# Altium PCB MB1379.PcbDoc
Units mm, origin at the board's own origin, x right, y up, seen from the top; angles counter-clockwise.
Board outline 29.13 x 44.63 mm, 2 copper layers (Top Layer, Bottom Layer), stack 1.571 mm thick; 39 components, 34 nets, 147 pads, 91 vias.
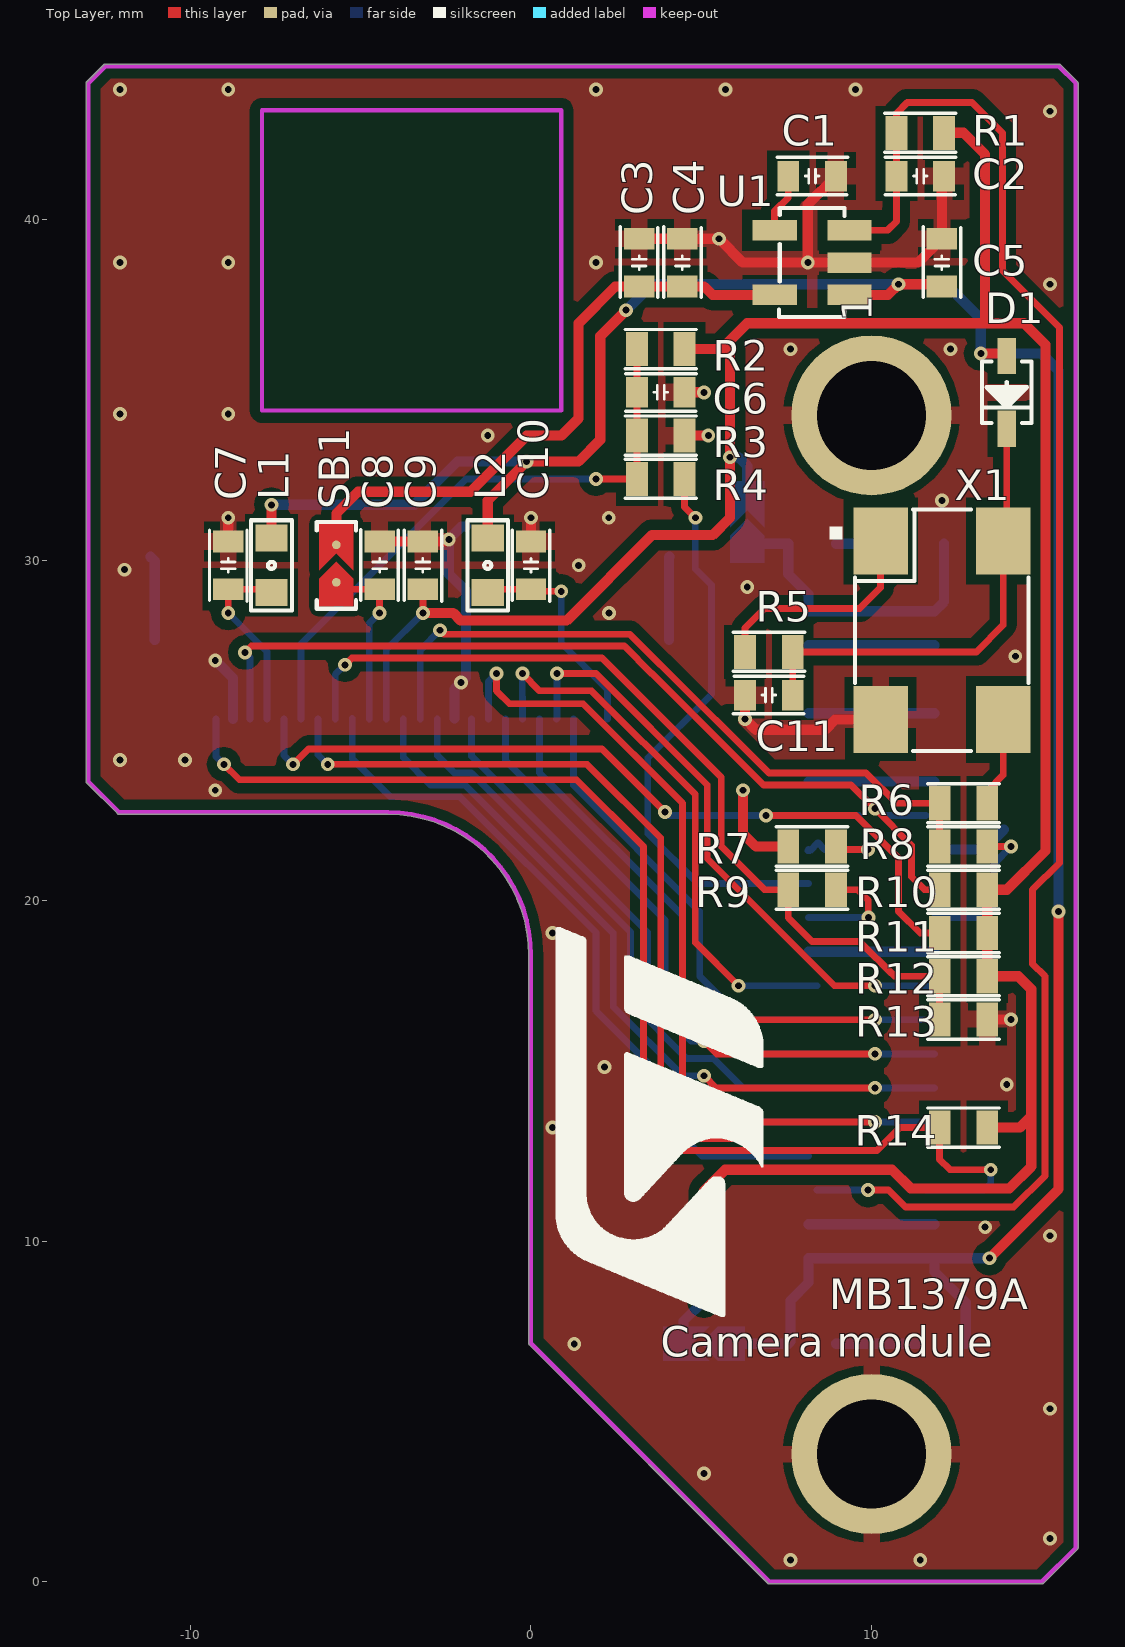
[diagram p0: Top Layer view]
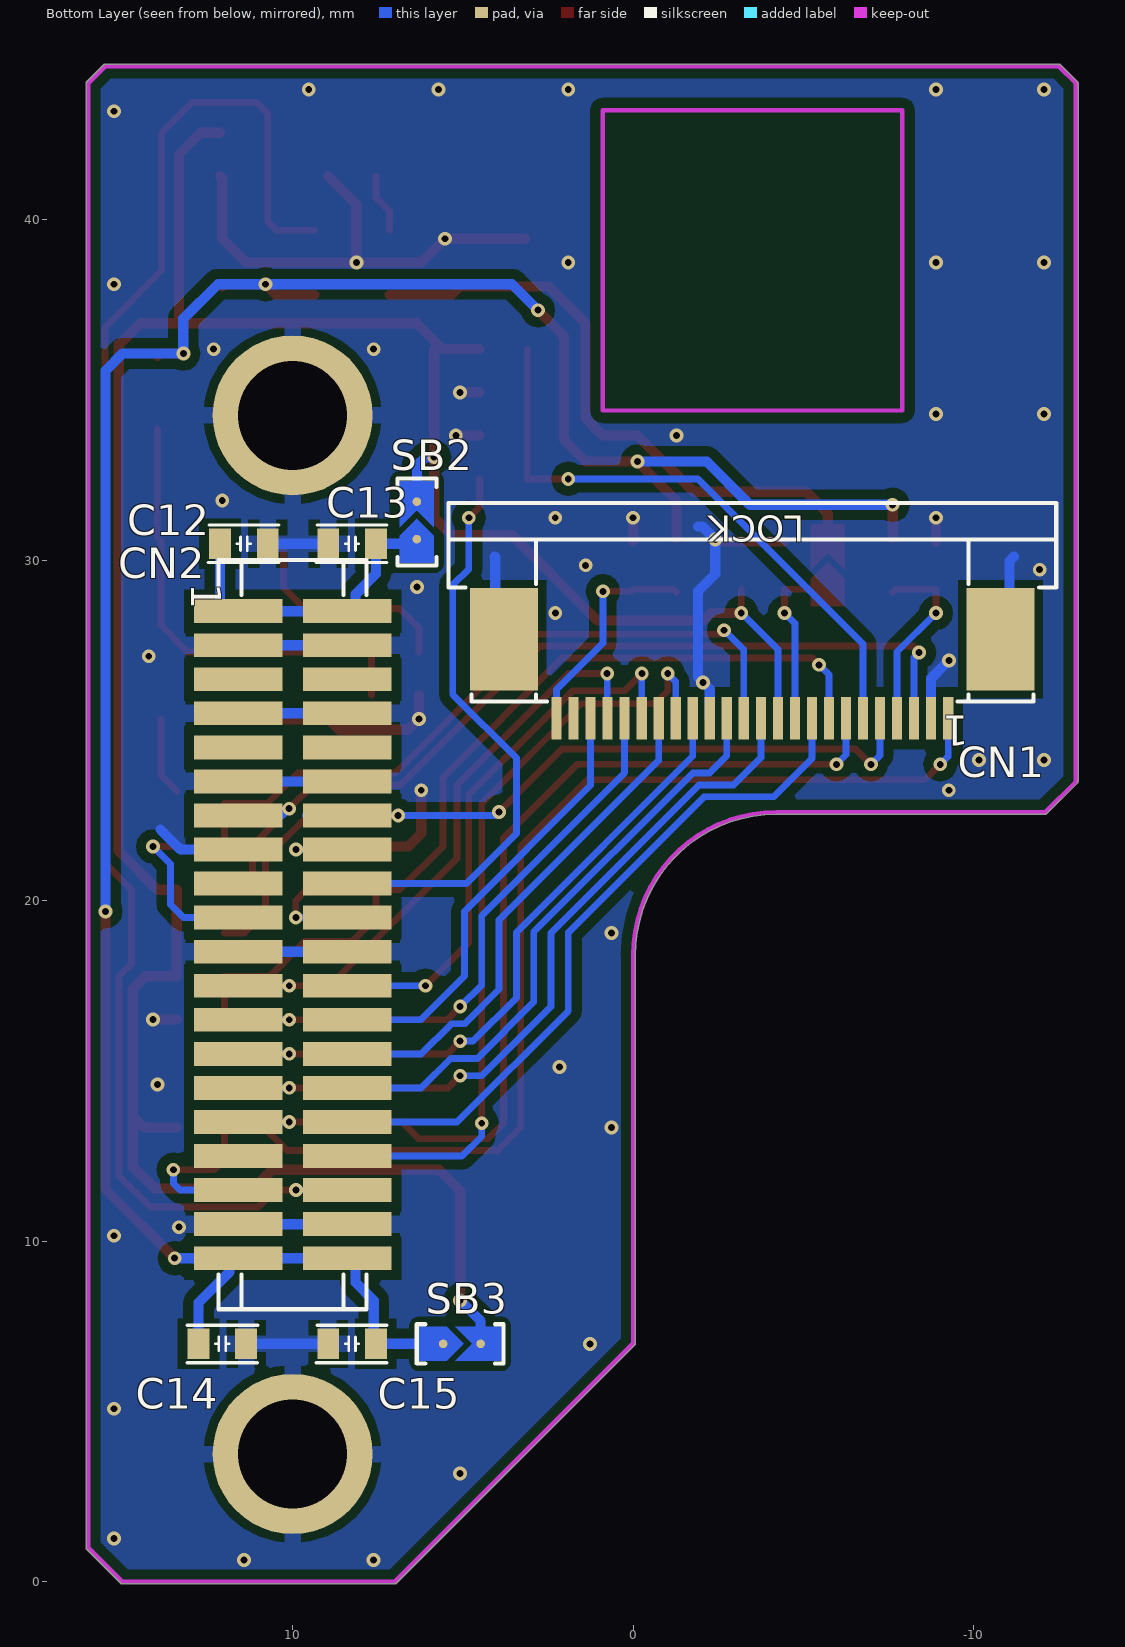
[diagram p1: Bottom Layer view, seen from below]
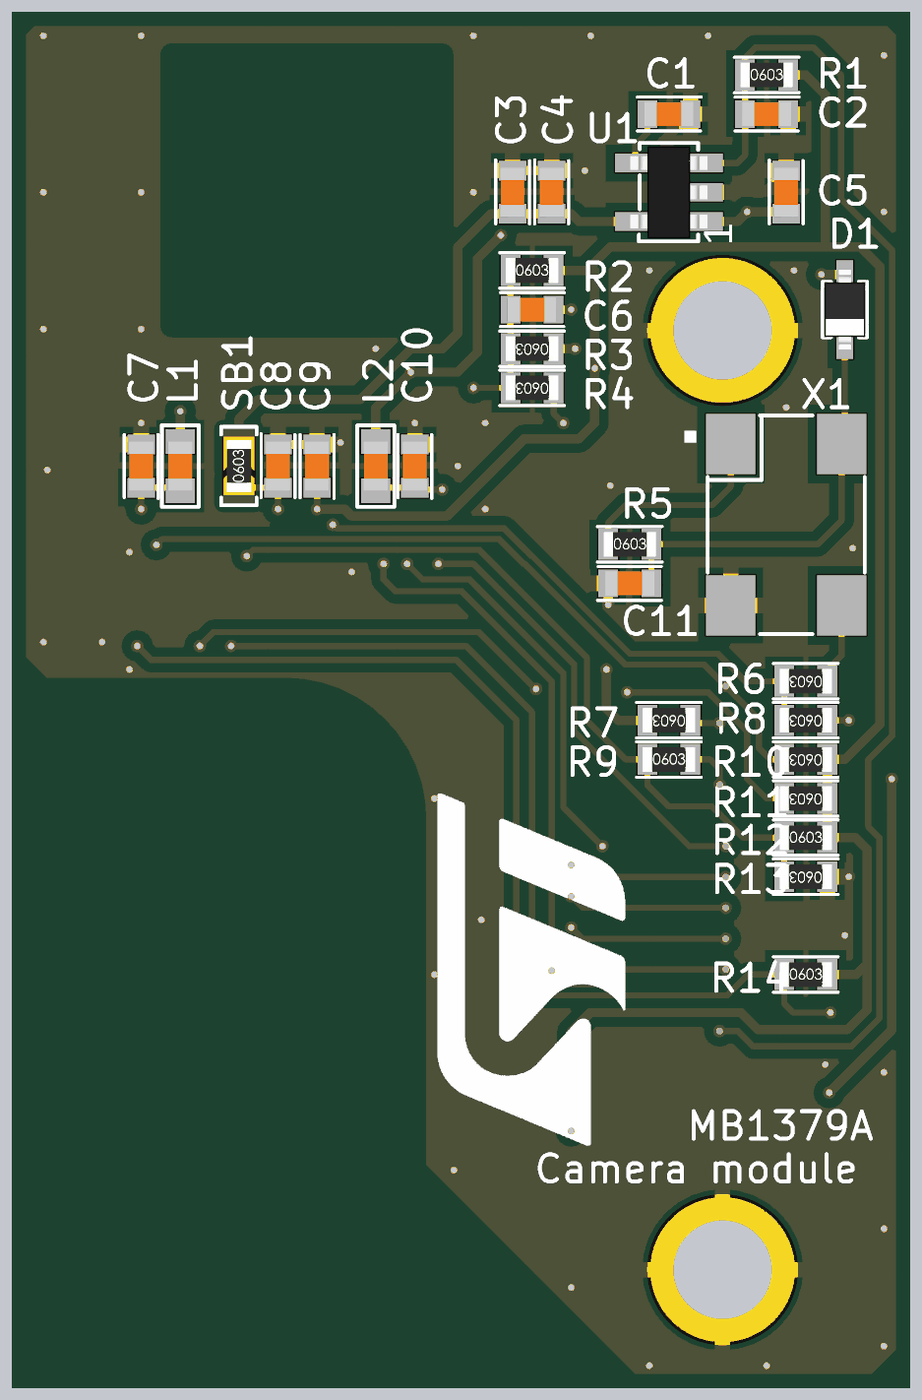
[diagram p2: 3D render of the assembled board from above, using the file's embedded part models]
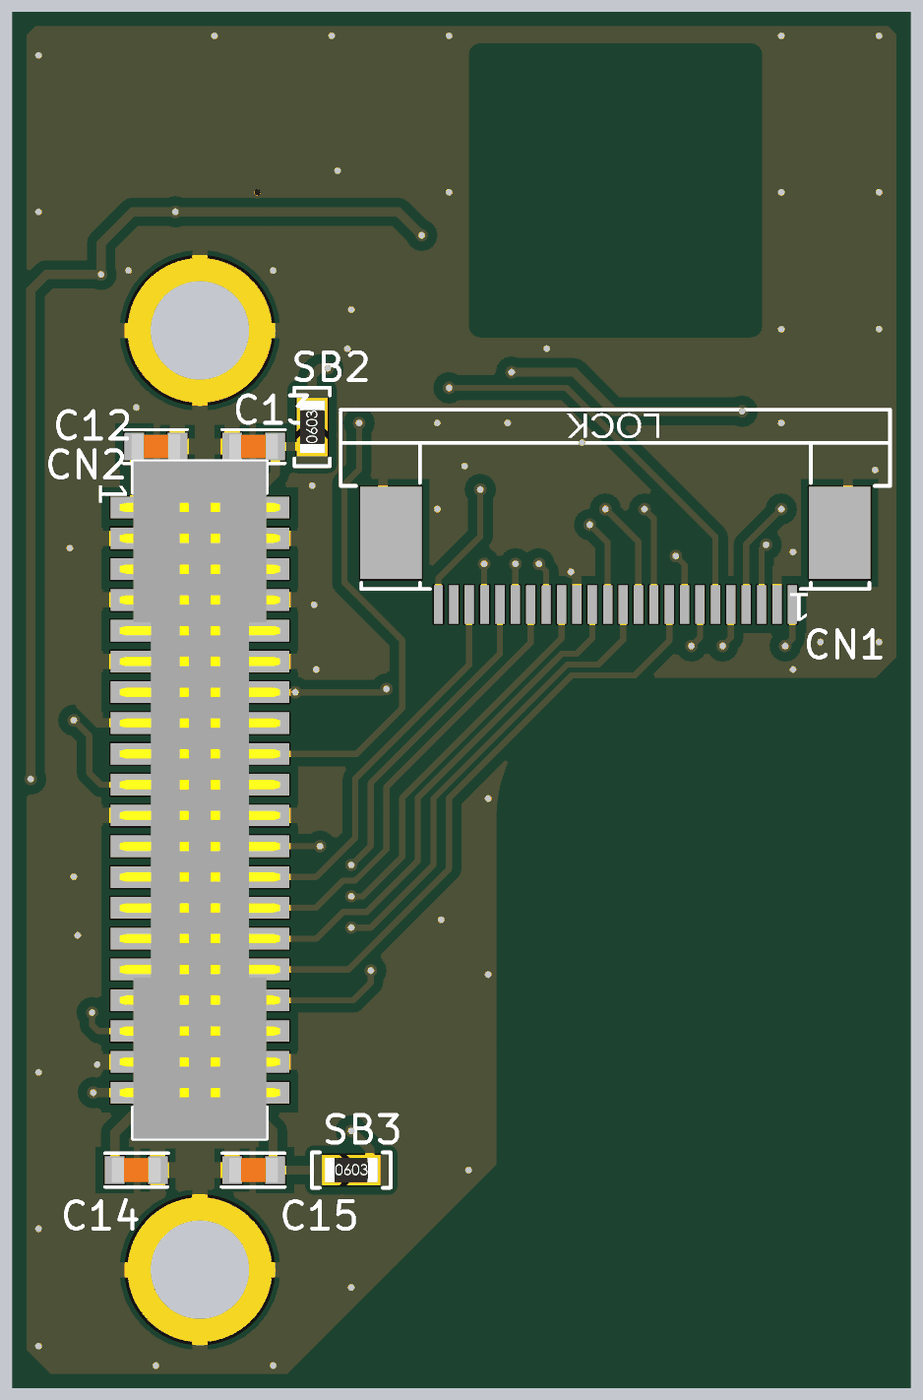
[diagram p3: 3D render of the assembled board from below, using the file's embedded part models]

## Layer stack, top to bottom
Top Solder: solder mask 0.0102, Solder Resist, Dk 3.5
Top Layer: signal copper 0.0356
Dielectric1: core 1.5, FR-4, Dk 4.8
Bottom Layer: signal copper 0.0356
Bottom Solder: solder mask 0.0102, Solder Resist, Dk 3.5

## Board outline
-12.1,22.536 -4.2,22.536 ccw(c-4.2,22.6) -4.199,22.536 cw(c-4.2,18.4) -0.064,18.4 ccw(c0,18.4) -0.064,18.399 -0.064,7 cw(c0,7) -0.064,7 ccw(c0,7) -0.045,6.955 cw(c0,7) -0.064,7 -0.045,6.955 6.955,-0.045 ccw(c7,0) 7,-0.064 15,-0.064 ccw(c15,0) 15.045,-0.045 16.045,0.955 ccw(c16,1) 16.064,1 16.064,44 ccw(c16,44) 16.045,44.045 15.545,44.545 ccw(c15.5,44.5) 15.5,44.564 -12.5,44.564 ccw(c-12.5,44.5) -12.545,44.545 -13.045,44.045 ccw(c-13,44) -13.064,44 -13.064,23.5 ccw(c-13,23.5) -13.045,23.455 -12.145,22.555 ccw(c-12.1,22.6)

## Design rules (kind name [scope] priority, off if disabled: settings)
Clearance Clearance_1 [(InPoly)] p1: gap=0.3
Clearance [All] p2: gap=0.15
FabricationTestPointUsage TestPointUsage [All] p1: valid=0 allowmultiple=FALSE
FabricationTestpoint Testpoint [(IsPad And (OnTopLayer Or OnBottomLayer))] p1: side=3 testpointundercomponent=TRUE minsize=1.016 maxsize=2.54 preferedsize=1.524 minholesize=0 maxholesize=1.016 preferedholesize=0.813 testpointgrid=0.025 allowsidetop=TRUE allowsidebottom=TRUE usegrid=TRUE gridtolerance=0
HoleSize [All] p1: absolutevalues=TRUE maxlimit=3.81 minlimit=0.025 maxpercent=80.000 minpercent=20.000
PlaneClearance [All] p1: clearance=0.5
PolygonConnect PolygonConnect_2 [(InComponent('CN1'))] p1: connectstyle=NoConnect reliefconductorwidth=0.254 reliefentries=2 polygonreliefangle="90 Angle" airgapwidth=0.254
PolygonConnect PolygonConnect_1 [IsVia] p2: connectstyle=Direct reliefconductorwidth=0.508 reliefentries=4 polygonreliefangle="90 Angle" airgapwidth=0.254
PolygonConnect [All] p3: connectstyle=Relief reliefconductorwidth=0.5 reliefentries=4 polygonreliefangle="90 Angle" airgapwidth=0.254
RoutingLayers [All] p1: top layer_v5=FALSE bottom layer_v5=FALSE
RoutingVias [All] p1: holewidth=0.3 width=0.6 viastyle="Through Hole" minholewidth=0.2 minwidth=0.4 maxholewidth=0.7 maxwidth=1.3
SolderMaskExpansion [All] p1: expansion=0.102
Width [All] p1: maxlimit=2.5 minlimit=0.15 preferedwidth=0.2 minimp=50.000000 maximp=50.000000 favimp=50.000000
25 further rules are at their usual default settings.

## Classes and differential pairs
net class PAR_D[0..7]: PAR_D0 PAR_D1 PAR_D2 PAR_D3 PAR_D4 PAR_D5 PAR_D6 PAR_D7

## Components (designator, comment, footprint, x,y, rotation, side; value= is the part's Value field where it differs from the comment)
C1 "" C0603 8.255,41.275 r180 top (schematic designator C66)
C2 "" C0603 11.43,41.275 r180 top (schematic designator C62)
C3 "" C0603 3.175,38.735 r270 top (schematic designator C68)
C4 "" C0603 4.445,38.735 r270 top (schematic designator C67)
C5 "" C0603 12.065,38.735 r270 top (schematic designator C61)
C6 "" C0603 3.81,34.925 r180 top (schematic designator C9)
C7 "" C0603 -8.89,29.845 r90 top (schematic designator C5)
C8 "" C0603 -4.445,29.845 r270 top (schematic designator C10)
C9 "" C0603 -3.175,29.845 r90 top (schematic designator C4)
C10 "" C0603 0,29.845 r90 top (schematic designator C3)
C11 "" C0603 6.985,26.035 r0 top (schematic designator C8)
C12 "" C0603 11.43,30.48 r180 bottom (schematic designator C2)
C13 "" C0603 8.255,30.48 r180 bottom (schematic designator C1)
C14 "" C0603 12.065,6.985 r0 bottom (schematic designator C7)
C15 "" C0603 8.255,6.985 r180 bottom (schematic designator C6)
CN1 "" CON_ATOM_FPC05024-03200 -3.5,30.6 r0 bottom (schematic designator CN2)
CN2 "" CON_SAMTEC_FTMH-120-03-L-DV-ES 10,19 r270 bottom (schematic designator CN1)
D1 "" DIO_SOD323 13.97,34.925 r270 top
L1 "" L0603 -7.62,29.845 r90 top
L2 "" L0603 -1.27,29.845 r90 top
R1 "" R0603 11.43,42.545 r0 top (schematic designator R10)
R2 "" R0603 3.81,36.195 r0 top
R3 "" R0603 3.81,33.655 r180 top (schematic designator R14)
R4 "" R0603 3.81,32.385 r180 top (schematic designator R13)
R5 "" R0603 6.985,27.305 r0 top (schematic designator R7)
R6 "" R0603 12.7,22.86 r180 top
R7 "" R0603 8.255,21.59 r180 top (schematic designator R3)
R8 "" R0603 12.7,21.59 r180 top (schematic designator R5)
R9 "" R0603 8.255,20.32 r0 top (schematic designator R12)
R10 "" R0603 12.7,20.32 r180 top (schematic designator R8)
R11 "" R0603 12.7,19.05 r180 top (schematic designator R9)
R12 "" R0603 12.7,17.78 r0 top (schematic designator R1)
R13 "" R0603 12.7,16.51 r180 top (schematic designator R4)
R14 "" R0603 12.7,13.335 r0 top (schematic designator R11)
SB1 "" SOLDER-BRIDGE_R0603-0R -5.715,29.845 r90 top
SB2 "" SOLDER-BRIDGE_R0603-0R 6.35,31.115 r90 bottom (schematic designator SB3)
SB3 "" SOLDER-BRIDGE_R0603-0R 5.08,6.985 r180 bottom (schematic designator SB2)
U1 "" REG_SOT23-5L 8.255,38.735 r90 top (schematic designator U2)
X1 "" OSC_PLE_SM77H-SERIES_7X5_H1P73_4P 12.065,27.94 r270 top

## Footprints (in the part's own frame and the unit in brackets; to place one, negate y for a bottom-side part, rotate by r counter-clockwise, add the part's x,y. Pads: shape width x height; smd on the part's side, far side on the other; paste and mask are expansions set on the pad)
C0603 [mm]
  rect 0.64x0.89 smd mask+0.05: 1(-0.7,0) 2(0.7,0)
  silkscreen extent -1.05,-0.55 1.02,0.55, body extent -0.9,-0.5 0.9,0.5, height 1.4
CON_ATOM_FPC05024-03200 [mm] "MCD-01009"
  rect 0.3x1.25 smd mask+0.05: 1(-5.75,5.25) 2(-5.25,5.25) 3(-4.75,5.25) 4(-4.25,5.25) 5(-3.75,5.25) 6(-3.25,5.25) 7(-2.75,5.25) 8(-2.25,5.25) 9(-1.75,5.25) 10(-1.25,5.25) 11(-0.75,5.25) 12(-0.25,5.25) 13(0.25,5.25) 14(0.75,5.25) 15(1.25,5.25) 16(1.75,5.25) 17(2.25,5.25) 18(2.75,5.25) 19(3.25,5.25) 20(3.75,5.25) 21(4.25,5.25) 22(4.75,5.25) 23(5.25,5.25) 24(5.75,5.25)
  rect 2x3 smd mask+0.05: 25(-7.29,2.925) 26(7.29,2.925)
  silkscreen extent -8.93,-1.07 8.93,4.75, body extent -8.93,-1.07 8.93,5.75, height 2.2
CON_SAMTEC_FTMH-120-03-L-DV-ES [mm] "MCD-01010"
  rect 0.7x2.6 smd mask+0.05: 1(-9.5,-1.6) 2(-9.5,1.6) 3(-8.5,-1.6) 4(-8.5,1.6) 5(-7.5,-1.6) 6(-7.5,1.6) 7(-6.5,-1.6) 8(-6.5,1.6) 9(-5.5,-1.6) 10(-5.5,1.6) 11(-4.5,-1.6) 12(-4.5,1.6) 13(-3.5,-1.6) 14(-3.5,1.6) 15(-2.5,-1.6) 16(-2.5,1.6) 17(-1.5,-1.6) 18(-1.5,1.6) 19(-0.5,-1.6) 20(-0.5,1.6) 21(0.5,-1.6) 22(0.5,1.6) 23(1.5,-1.6) 24(1.5,1.6) 25(2.5,-1.6) 26(2.5,1.6) 27(3.5,-1.6) 28(3.5,1.6) 29(4.5,-1.6) 30(4.5,1.6) 31(5.5,-1.6) 32(5.5,1.6) 33(6.5,-1.6) 34(6.5,1.6) 35(7.5,-1.6) 36(7.5,1.6) 37(8.5,-1.6) 38(8.5,1.6) 39(9.5,-1.6) 40(9.5,1.6)
  silkscreen extent -11,-2.17 11,2.17, body extent -11,-2.6 11,2.6, height 3.84
DIO_SOD323 [mm]
  rect 1.06x0.54 smd mask+0.05: 1(-1.07,0) 2(1.07,0)
  silkscreen extent -0.9,-0.72 0.9,0.72, body extent -1.3,-0.78 1.3,0.78, height 1.17
L0603 [mm]
  rect 0.8x0.95 smd mask+0.05: 1(-0.8,0) 2(0.8,0)
  silkscreen extent -1.33,-0.6 1.33,0.6, body extent -0.87,-0.47 0.87,0.47, height 0.95
OSC_PLE_SM77H-SERIES_7X5_H1P73_4P [mm]
  rect 1.96x1.6 smd mask+0.05: 1(-2.62,-1.8) 2(2.62,-1.8) 3(2.62,1.8) 4(-2.62,1.8)
  silkscreen extent -3.55,-3.3 3.55,2.55, body extent -3.55,-2.55 3.55,2.55, height 2.17
R0603 [mm]
  rect 0.64x1 smd mask+0.05: 1(-0.7,0) 2(0.7,0)
  silkscreen extent -1.05,-0.58 1.05,0.58, body extent -0.9,-0.5 0.9,0.5, height 0.56
REG_SOT23-5L [mm]
  rect 0.6x1.3 smd mask+0.05: 1(-0.95,-1.1) 2(0,-1.1) 3(0.95,-1.1) 4(0.95,1.1) 5(-0.95,1.1)
  silkscreen extent -1.6,-0.95 1.6,0.97, body extent -1.52,-1.25 1.52,1.25, height 1.1
SOLDER-BRIDGE_R0603-0R [mil]
  round 10 smd: 1(-19.68,0) 2(23.62,0)
  Top Layer region: -47.24,-19.69 -47.24,19.68 -15.75,19.68 3.94,0 -15.75,-19.69 -47.24,-19.69
  Top Layer region: -5.91,19.68 13.78,0 -5.91,-19.69 47.24,-19.69 47.24,19.68 -5.91,19.68
  silkscreen extent -50,-23 50,23, body extent -36,-20 36,20, height 22

## Part data
C1: library part MCD-01007, "Capacitor, MLCC, 10nF, 16V, X7R, 10%, 0603, T=0.8mm"
C2 C4 C7 C8 C9 C10 C11 C12 C13 C14 C15: library part MCD-00211, "Capacitor,100nF,16V,X7R,10%,0603"
C3 C5: library part MCD-00010, "Capacitor,1uF,16V,X5R,10%,0603"
C6: library part MCD-01006, "Capacitor, MLCC, 470nF, 16V, X7R, 10%, 0603, T=0.8mm"
CN1: library part MCD-01009, "FFC/FPC ZIF Connector -?0.5mm, 24 pins, Upper Contacts"
CN2: library part MCD-01010, "Header 20x2, 1mm, Dual Vertical,SMT,End Shroud,Height 3.25mm"
D1: library part MCD-00034, "BAT60JFILM"
L1 L2: library part MCD-00047, "SMD Chip ferrite bead, 600R@100MHz +/-25%, 350mA, 500mohm DC, 0603, T=0.8mm"
R1 R2 R3 R5 R13 R14: library part MCD-00220, "Resistor,10K,0603,1%,1/10W"
R4: library part MCD-00420, "Resistor,2K,0603,1%,1/10W"
R6 R7 R8 R9: library part MCD-00056, "Resistor,0R,0603,5%,1/10W"
R10 R11: library part MCD-00219, "Resistor,4K7,0603,1%,1/10W"
R12: library part MCD-00430, "Resistor,22K,0603,1%,1/10W"
SB1 SB3: library part MCD-00071, "Solder Bridge ON"
SB2: library part MCD-00072, "Solder Bridge OFF"
U1: library part MCD-01008, "LDO - 300 mA low quiescent current - very low noise"
X1: library part MCD-01011, "SM77H Series 2.5V? CMOS 24MHz Clock Oscillator"

## Free pads (board coordinates)
  round 4.7 hole 3.2: 0(10,3.75) 0(10,34.25)

## Via types
v1: diameter 0.406, hole 0.203, Top Layer to Bottom Layer, tented both sides, 75 vias
v2: diameter 0.4, hole 0.2, Top Layer to Bottom Layer, tented both sides, 16 vias

## Nets (pads, with @x,y where several pads share a name; then routed paths per layer and width w, separated by ;. In a path a pad name is that pad's centre, name@x,y a point inside that pad or via, vN(x,y) a via of type N, cw(c..) or ccw(c..) an arc to the next point about the centre after c; other vN are vias at no path point)
+1V8: C12.1 C13.2 CN2.1 CN2.2 SB2.1 | length 9.3
  Bottom Layer w0.3: SB2.1 6.485,30.48 C13.2 7.555,29.591 8.15,28.996 8.15,28.5 11.85,28.5 12.13,28.78 C12.1
+2V8: C5.2 C14.2 C15.2 CN2.39 CN2.40 D1.1 L1.2 L2.2 SB3.1 U1.1 | length 75.7
  Top Layer w0.3: L1.2 v1(-7.62,31.623) ; L2.2 -1.27,31.75 v1(-0.127,32.893) 1.397,32.893 2.032,33.528 2.032,36.576 v1(2.794,37.338) ; U1.1 10.48,37.785 v1(10.795,38.1) 12,38.1 C5.2 ; v1(13.208,36.068) 13.897,36.068 D1.1 ; v1(13.462,9.5) 15.494,11.532 v1(15.494,19.685)
  Bottom Layer w0.3: v1(-7.62,31.623) -3.429,31.623 -2.159,32.893 v1(-0.127,32.893) ; v1(2.794,37.338) 3.556,38.1 v1(10.795,38.1) 12.192,38.1 13.208,37.084 v1(13.208,36.068) 14.986,36.068 15.494,35.56 v1(15.494,19.685) ; 6.28,6.985 C15.2 7.62,7.05 7.62,8.255 8.15,8.785 8.15,9.5 CN2.39@11.85,9.5 ; C14.2 12.765,8.19 11.85,9.105 CN2.39@11.85,9.5 ; v1(13.462,9.5) CN2.39@11.85,9.5
CAMERA_CLK: CN1.13 R6.2 R8.2 | length 20.9
  Top Layer w0.2: v1(-2.667,27.94) -2.55,27.823 2.898,27.823 3.797,26.924 3.81,26.924 6.985,23.749 9.841,23.749 10.73,22.86 R6.2 R8.2
  Bottom Layer w0.2: CN1.13@-3.25,25.338 -3.25,27.357 v1(-2.667,27.94)
CAMERA_RST: CN2.18 R4.1 | length 16.8
  Top Layer w0.2: R4.1 4.51,31.558 v1(4.826,31.242)
  Bottom Layer w0.2: v1(4.826,31.242) 4.826,29.74 5.3,29.266 5.3,26.059 3.429,24.188 3.429,21.971 4.9,20.5 CN2.18@8.15,20.5
CAMERA_RST_S5K: C6.2 CN1.6 R2.1 R3.2 R4.2 | length 17.9
  Top Layer w0.2: v1(1.905,32.385) R4.2 R3.2 C6.2 R2.1
  Bottom Layer w0.2: CN1.6@-6.75,25.338 -6.75,27.54 -1.905,32.385 v1(1.905,32.385)
DOVDD: C9.1 CN1.11 R1.2 R2.2 R10.1 R11.1 R12.2 R14.2 SB2.2 SB3.2 | length 81.7
  Top Layer w0.2: v1(-3.175,28.448) C9.1
  Top Layer w0.3: v1(-3.175,28.448) -2.286,28.448 -2.061,28.223 1.045,28.223 3.561,30.739 3.566,30.734 5.334,30.734 5.842,31.242 v1(5.842,33.02) 5.842,36.195 R2.2 ; v1(5.08,8.255) 5.08,11.48 5.7,12.1 10.6,12.1 11.15,11.55 14.05,11.55 14.691,12.191 14.691,17.399 14.31,17.78 R12.2 R11.1 R10.1 13.97,20.32 15.108,21.458 15.108,36.327 14.478,36.957 13.335,36.957 ; 5.588,36.195 6.35,36.957 13.335,36.957 ; R1.2 12.7,42.545 13.335,41.91 13.335,36.957 ; R14.2 14.351,13.335 14.6,13.584
  Bottom Layer w0.2: CN1.11@-4.25,25.338 -4.25,27.373 v1(-3.175,28.448)
  Bottom Layer w0.3: SB3.2 4.48,7.655 v1(5.08,8.255) ; v1(5.842,33.02) 6.096,33.02 6.35,32.766 SB2.2
E1V5: C3.2 C4.2 SB1.2 U1.5 | length 18.3
  Top Layer w0.3: SB1.2 -5.715,31.369 -5.08,32.004 -1.778,32.004 -0.127,33.655 0.889,33.655 1.397,34.163 1.397,36.957 2.475,38.035 C3.2 C4.2 5.084,38.035 5.334,37.785 U1.5
EXTCLK: CN2.19 R8.1 | length 4.5
  Top Layer w0.203: R8.1 v1(14.097,21.59)
  Bottom Layer w0.203: CN2.19@11.85,19.5 13.208,19.5 13.589,19.881 13.589,21.082 v1(14.097,21.59)
FLASH: CN1.1 CN2.35 R14.1 | length 37.2
  Top Layer w0.2: v1(-9.017,24.003) -8.564,23.55 1.342,23.55 3.302,21.59 3.302,13.335 3.978,12.659 10.159,12.659 10.835,13.335 R14.1 12,12.4 12.3,12.1 v2(13.5,12.1)
  Bottom Layer w0.2: CN1.1@-9.25,25.338 -9.25,24.236 v1(-9.017,24.003) ; CN2.35 13.3,11.5 13.5,11.7 v2(13.5,12.1)
GND: C1.1 C2.1 C3.1 C4.1 C5.1 C6.1 C7.2 C8.1 C9.2 C10.2 C11.1 C12.2 C13.1 C14.1 C15.1 CN1.2 CN1.15 CN1.25 CN1.26 CN2.3 CN2.4 CN2.7 CN2.8 CN2.11 CN2.12 CN2.15 CN2.21 CN2.22 CN2.37 CN2.38 pad.0 R3.1 R7.2 R13.1 U1.2 X1.2 | length 65.2
  Top Layer w0.3: C7.2 v1(-8.89,31.242) ; C8.1 C9.2 -2.475,30.545 v1(-2.413,30.607) ; C10.2 v1(0,31.242) ; C3.1 C4.1 v1(5.523,39.435) 6.223,38.735 v1(8.128,38.735) ; R3.1 v1(5.207,33.655) ; C6.1 v1(5.08,34.925) ; v1(6.223,23.241) 6.223,21.971 6.604,21.59 R7.2 ; C11.1 v1(6.285,25.338) 6.604,25.019 8.636,25.019 8.937,25.32 X1.2 ; C1.1 8.128,40.448 v1(8.128,38.735) ; C2.1 12.065,41.21 C5.1 11.365,38.735 U1.2 v1(8.128,38.735) ; R13.1 v1(14.097,16.51)
  Bottom Layer w0.3: -11.176,30.099 -11.05,29.973 CN1.25@-11.05,27.662 ; v1@-9.144,26.924 -8.75,26.53 CN1.2@-8.75,25.338 ; CN1.15 -2.25,26.212 v1(-2.052,26.41) -1.905,26.557 -1.905,29.083 -2.413,29.591 v1(-2.413,30.607) -2.032,30.988 -1.905,30.988 ; CN1.26@4.05,27.662 4.05,30.085 4.064,30.099 ; CN2.38@8.15,10.5 CN2.37@11.85,10.5 ; CN2.22@8.15,18.5 CN2.22 CN2.21 CN2.21@11.85,18.5 ; CN2.12@8.15,23.5 CN2.11@11.85,23.5 ; CN2.8@8.15,25.5 CN2.7@11.85,25.5 ; CN2.4@8.15,27.5 CN2.3@11.85,27.5 ; C15.1 C14.1 ; C13.1 C12.2 ; CN2.15@11.85,21.5 13.295,21.5 13.88,22.085
  other v1: 7.62,0.635 11.43,0.635 15.24,1.27 5.08,3.175 15.24,5.08 1.27,6.985 15.24,10.16 0.635,13.335 13.97,14.605 2.159,15.113 0.635,19.05 -12.065,24.13 -10.16,24.13 -9.271,27.051 2.286,28.448 6.35,29.21 -11.938,29.718 12.065,31.75 -1.27,33.655 -12.065,34.29 -8.89,34.29 15.24,38.1 -12.065,38.735 -8.89,38.735 1.905,38.735 15.24,43.18 -12.065,43.815 -8.89,43.815 1.905,43.815 5.715,43.815 9.525,43.815
  other v2: 13.335,10.414 -9.271,23.241 14.224,27.178 1.397,29.845 2.286,31.242 7.62,36.195 12.319,36.195
NetC1_2: C1.2 U1.4 | length 1.8
  Top Layer w0.2: U1.4 7.155,40.248 7.555,40.648 C1.2
NetC7_1: C7.1 CN1.4 L1.1 | length 5.6
  Top Layer w0.2: v1(-8.89,28.448) C7.1 -7.72,29.145 L1.1
  Bottom Layer w0.2: v1(-8.89,28.448) -7.75,27.308 CN1.4@-7.75,25.338
NetC8_2: C8.2 CN1.10 SB1.1 | length 5.3
  Top Layer w0.2: SB1.1 -5.515,29.145 C8.2 v1(-4.445,28.448)
  Bottom Layer w0.2: CN1.10@-4.75,25.338 -4.75,28.143 v1(-4.445,28.448)
NetC10_1: C10.1 CN1.24 L2.1 | length 6.5
  Top Layer w0.2: L2.1 -1.17,29.145 C10.1 0.062,29.083 v1(0.889,29.083)
  Bottom Layer w0.2: v1(0.889,29.083) 0.889,27.559 2.25,26.198 CN1.24@2.25,25.338
NetC11_2: C11.2 D1.2 R5.2 X1.4 | length 13.6
  Top Layer w0.2: C11.2 R5.2 13.081,27.305 13.865,28.089 X1.4 13.97,30.665 D1.2
NetCN2_16: CN2.16 R7.1 | length 3
  Top Layer w0.2: R7.1 9.045,21.5 v1(9.9,21.5)
  Bottom Layer w0.2: CN2.16@8.128,21.463 8.15,21.485 8.15,21.5 8.187,21.463 8.424,21.7 8.624,21.5 v1(9.9,21.5)
NetCN2_20: CN2.20 R9.2 | length 3.3
  Top Layer w0.2: R9.2 9.586,20.32 9.906,20 v1(9.906,19.5)
  Bottom Layer w0.2: CN2.20@8.15,19.5 v1(9.906,19.5)
NetR5_1: R5.1 X1.1 | length 6.5
  Top Layer w0.2: R5.1 6.285,28.002 6.858,28.575 9.652,28.575 10.265,29.188 X1.1
NetR6_1: R6.1 X1.3 | length 2.3
  Top Layer w0.2: R6.1@13.4,23.223 13.865,23.687 X1.3
PAR_D0: CN1.19 CN2.24 | length 16.3
  Top Layer w0.2: v1(-0.254,26.67) 0.254,26.162 1.778,26.162 4.826,23.114 4.826,18.77 v1(6.096,17.5)
  Bottom Layer w0.2: v1(-0.254,26.67) CN1.19@-0.25,25.338 ; v1(6.096,17.5) CN2.24
PAR_D1: CN1.21 CN2.23 | length 19
  Top Layer w0.2: v1(0.762,26.67) 1.905,26.67 5.176,23.399 5.176,21.24 8.916,17.5 v2(10.1,17.5)
  Bottom Layer w0.2: CN1.21@0.75,25.338 0.762,25.349 v1(0.762,26.67) ; CN2.23 v2(10.1,17.5) CN2.23@11.85,17.5
PAR_D2: CN1.22 CN2.26 | length 12.8
  Bottom Layer w0.2: CN1.22@1.25,25.338 1.25,23.388 4.953,19.685 4.953,17.786 6.239,16.5 CN2.26@8.15,16.5
PAR_D3: CN1.20 CN2.25 | length 17.4
  Top Layer w0.2: v2(5.08,16.891) 5.471,16.5 v2(10.1,16.5)
  Bottom Layer w0.2: CN1.20@0.25,25.338 0.25,23.753 4.445,19.558 4.445,17.526 v2(5.08,16.891) ; v2(10.1,16.5) CN2.25 CN2.25@11.85,16.5
PAR_D4: CN1.18 CN2.28 | length 14.9
  Bottom Layer w0.2: CN1.18@-0.75,25.338 -0.75,24.118 3.937,19.431 3.937,17.398 4.894,16.441 4.898,16.441 4.956,16.383 5.34,16.383 6.223,15.5 CN2.28@8.15,15.5
PAR_D5: CN1.16 CN2.27 | length 19.4
  Top Layer w0.2: v2(5.08,15.875) 5.455,15.5 v2(10.1,15.5)
  Bottom Layer w0.2: CN1.16@-1.75,25.338 -1.75,24.242 3.429,19.063 3.429,17.145 4.699,15.875 v2(5.08,15.875) ; v2(10.1,15.5) CN2.27 CN2.27@11.85,15.5
PAR_D6: CN1.14 CN2.30 | length 17.2
  Bottom Layer w0.2: CN1.14@-2.75,25.338 -2.75,24.257 -2.242,23.749 -1.752,23.749 2.921,19.076 2.921,17.018 4.572,15.367 5.356,15.367 6.223,14.5 CN2.30@8.15,14.5
PAR_D7: CN1.12 CN2.29 | length 22
  Top Layer w0.2: v2(5.08,14.859) 5.439,14.5 v2(10.1,14.5)
  Bottom Layer w0.2: CN1.12@-3.75,25.338 -3.75,24.197 -2.952,23.399 -1.936,23.399 2.413,19.05 2.413,16.891 4.445,14.859 v2(5.08,14.859) ; v2(10.1,14.5) CN2.29 CN2.29@11.85,14.5
PAR_HSYNC: CN1.9 CN2.32 | length 20.3
  Bottom Layer w0.2: CN1.9 -5.25,24.173 -4.126,23.049 -2.081,23.049 1.905,19.063 1.905,16.764 5.169,13.5 CN2.32@8.15,13.5
PAR_PCLK: CN1.17 CN2.34 | length 22.5
  Top Layer w0.2: v1(-1.016,26.67) -1.016,26.162 -0.635,25.781 1.524,25.781 4.445,22.86 v1(4.445,13.462)
  Bottom Layer w0.2: CN1.17@-1.25,25.338 -1.25,26.436 v1(-1.016,26.67) ; v1(4.445,13.462) 4.445,13.081 5.026,12.5 CN2.34@8.15,12.5
PAR_VSYNC: CN1.7 CN2.31 | length 28.9
  Top Layer w0.2: v1(-5.969,24.003) 1.651,24.003 3.81,21.844 3.81,13.456 4.257,13.009 6.3,13.009 6.791,13.5 v2(10.1,13.5)
  Bottom Layer w0.2: CN1.7@-6.25,25.338 -6.25,24.284 v1(-5.969,24.003) ; v2(10.1,13.5) CN2.31 CN2.31@11.85,13.5
SCL: CN1.5 CN2.14 R11.2 | length 27.7
  Top Layer w0.2: v1(-6.985,24.003) -6.532,24.456 2.087,24.456 v1(3.937,22.606) ; v1(6.9,22.5) 9.541,22.5 10.795,21.246 10.795,19.685 11.43,19.05 R11.2
  Bottom Layer w0.2: CN1.5@-7.25,25.338 -7.25,24.268 v1(-6.985,24.003) ; v1(3.937,22.606) 4.043,22.5 v1(6.9,22.5) CN2.14 ; CN2.14 9.631,22.5 CN2.14
SDA: CN1.3 CN2.13 R10.2 | length 27.6
  Top Layer w0.2: v1(-8.397,27.29) -8.214,27.473 2.74,27.473 3.543,26.67 3.556,26.67 6.827,23.399 9.401,23.399 v1(10.1,22.7) 11.176,21.624 11.176,20.701 11.557,20.32 R10.2
  Bottom Layer w0.2: v1(-8.397,27.29) -8.25,27.142 CN1.3@-8.25,25.338 ; v1(10.1,22.7) 10.3,22.5 CN2.13
SHUTTER: C2.2 CN2.36 R1.1 U1.3 | length 47.3
  Top Layer w0.203: U1.3 10.475,39.685 10.73,39.94 C2.2 R1.1 10.73,43.115 11.049,43.434 12.954,43.434 13.843,42.545 13.843,38.502 15.515,36.83 15.515,21.103 14.732,20.32 14.732,18.14 15.092,17.78 15.092,11.917 14.175,11 11,11 10.5,11.5 v1(9.9,11.5)
  Bottom Layer w0.203: CN2.36 v1(9.9,11.5)
STANDBY: CN1.8 R9.1 R12.1 R13.2 | length 26.5
  Top Layer w0.2: v1(-5.461,26.924) -5.262,27.123 2.087,27.123 5.588,23.622 5.588,21.59 6.858,20.32 R9.1 7.555,19.496 8.255,18.796 9.652,18.796 10.668,17.78 R12.1 R13.2 R13.2@11.931,16.441 ; 10.286,18.15 10.55,17.886
  Bottom Layer w0.2: CN1.8@-5.75,25.338 -5.75,26.635 v1(-5.461,26.924)
pads on no net: CN1.23 CN2.5 CN2.6 CN2.9 CN2.10 CN2.17 CN2.33

## Polygon pours and split planes (outlines as drawn)
GND on Bottom Layer "Bottom Layer-No Net" (solid, remove dead copper, pour order 0): -13.081,44.45 15.875,44.45 16.002,44.577 16.002,0 -12.954,0 -13.081,-0.127 -13.081,44.45
GND on Top Layer "top Layer-GND" (solid, remove dead copper, pour order 2): -13.208,44.577 15.875,44.577 15.875,0.875 15,0 7,0 0,7 -13.208,20.208 -13.208,44.577

## Keep-outs
Keep-Out Layer:
  lines w0.127: -13,23.5 -12.1,22.6 -5.6,22.6 -4.2,22.6 cw(c-4.2,18.4) 0,18.4 0,7 7,0 15,0 16,1 16,39 16,44 15.5,44.5 -12.5,44.5 -13,44 -13,23.5 ; -7.899,34.392 -7.899,43.205 0.889,43.205 0.889,34.392 -7.899,34.392

## Silkscreen, mask and mechanical layers (free items; w line width, h text height)
Top Overlay:
  drawing of 1036 lines, arcs and shapes, not listed
  text "MB1379A" at 8.763,8.001 h0.89
  text "Camera module" at 3.81,6.604 h0.89
Mechanical 1:
  lines w0.127: 0,9 0,7 ; 0,7 7,0 15,0 16,1 16,39 16,44 15.5,44.5 -12.5,44.5 -13,44 -13,23.5 -12.1,22.6 -4.2,22.6 cw(c-4.2,18.4) 0,18.4 0,7 ; -7.9,34.4 0.9,34.4 0.9,43.2 -7.9,43.2 -7.9,34.4
  text "MB1379" at -12.192,44.831 h0.89
Drill Drawing:
  lines w0.051: 26.024,9.359 53.476,9.359 ; 26.024,10.347 53.476,10.347 ; 24.5,3.33 ccw(c24.83,3.33) 24.83,3 54.67,3 ccw(c54.67,3.33) 55,3.33 55,12.17 ccw(c54.67,12.17) 54.67,12.5 24.83,12.5 ccw(c24.83,12.17) 24.5,12.17 24.5,3.33
  text ".legend" at 19.5,39 h0.89
  text "Layer Stack Up Detail for: MB1379.PcbDoc" at 26.024,10.92 h0.66
  text "Layer" at 26.024,9.978 h0.23
  text "Gerber" at 32.02,9.978 h0.23
  text "Copper" at 34.791,9.978 h0.23
  text "Dielectric" at 37.936,9.978 h0.23
  text "Dielectric" at 41.24,9.978 h0.23
  text "Dielectric" at 45.585,9.978 h0.23
  text "Dielectric" at 48.89,9.978 h0.23
  text "Name" at 26.024,9.521 h0.23
  text "Document" at 32.02,9.521 h0.23
  text "Thickness" at 34.791,9.521 h0.23
  text "Height" at 37.936,9.521 h0.23
  text "Material" at 41.24,9.521 h0.23
  text "Constant" at 45.585,9.521 h0.23
  text "Type" at 48.89,9.521 h0.23
  text "Top Solder Mask" at 26.024,8.74 h0.33
  text "(.GTS)" at 32.02,8.74 h0.33
  text "0.4mil" at 37.936,8.74 h0.33
  text "Solder Resist" at 41.24,8.74 h0.33
  text "3.50" at 45.585,8.74 h0.33
  text "Top Layer" at 26.024,7.552 h0.33
  text "(.GTL)" at 32.02,7.552 h0.33
  text "1.4mil" at 34.791,7.552 h0.33
  text "59.055mil" at 37.936,6.958 h0.33
  text "FR-4" at 41.24,6.958 h0.33
  text "4.80" at 45.585,6.958 h0.33
  text "Core" at 48.89,6.958 h0.33
  text "Bottom Layer" at 26.024,6.365 h0.33
  text "(.GBL)" at 32.02,6.365 h0.33
  text "1.4mil" at 34.791,6.365 h0.33
  text "Bottom Solder Mask" at 26.024,5.177 h0.33
  text "(.GBS)" at 32.02,5.177 h0.33
  text "0.4mil" at 37.936,5.177 h0.33
  text "Solder Resist" at 41.24,5.177 h0.33
  text "3.50" at 45.585,5.177 h0.33

## Dimensions
7,0 to 16,1 on Mechanical 1
7,0 to 0,7 on Mechanical 1
-12.5,44.5 to -12.1,22.6 on Mechanical 1
-12.5,44.5 to 7,0 on Mechanical 1
-13,44 to 16,39 on Mechanical 1

## Text inside footprints (layer, text, board x,y; h text height)
CN1: Mechanical 14 "24" at 1.7,25.725 h1.2 r180; Mechanical 14 "LOCK" at -5.025,31.55 h1.3 r180; Mechanical 14 "1" at -9.4,25.725 h1.2 r180; Bottom Overlay "LOCK" at -5.025,31.55 h1.3 r180; Bottom Overlay "1" at -9.85,25.725 h1.5 r180
CN2: Mechanical 14 "1" at 12.5,28.7 h1.3 r90; Mechanical 14 "39" at 12.5,10.1 h1.3 r90; Mechanical 14 "40" at 8.325,10.1 h1.3 r90; Mechanical 14 "2" at 8.325,28.8 h1.3 r90; Bottom Overlay "1" at 13.275,29.325 h1.5 r90
D1: Mechanical 14 "K" at 13.71,33.775 h1.5 r270
U1: Top Overlay "1" at 10.305,37.01 h1.5 r90